# Altium PCB PCB2.pcbdoc (part 2 of 3)
Units mil, origin at the board's own origin, x right, y up, seen from the top; angles counter-clockwise.
Board outline 1771.65 x 2755.61 mil, 4 copper layers (Top Layer, Inner1, Inner2, Bottom Layer), stack 62.447 mil thick; 80 components, 88 nets, 409 pads, 183 vias.
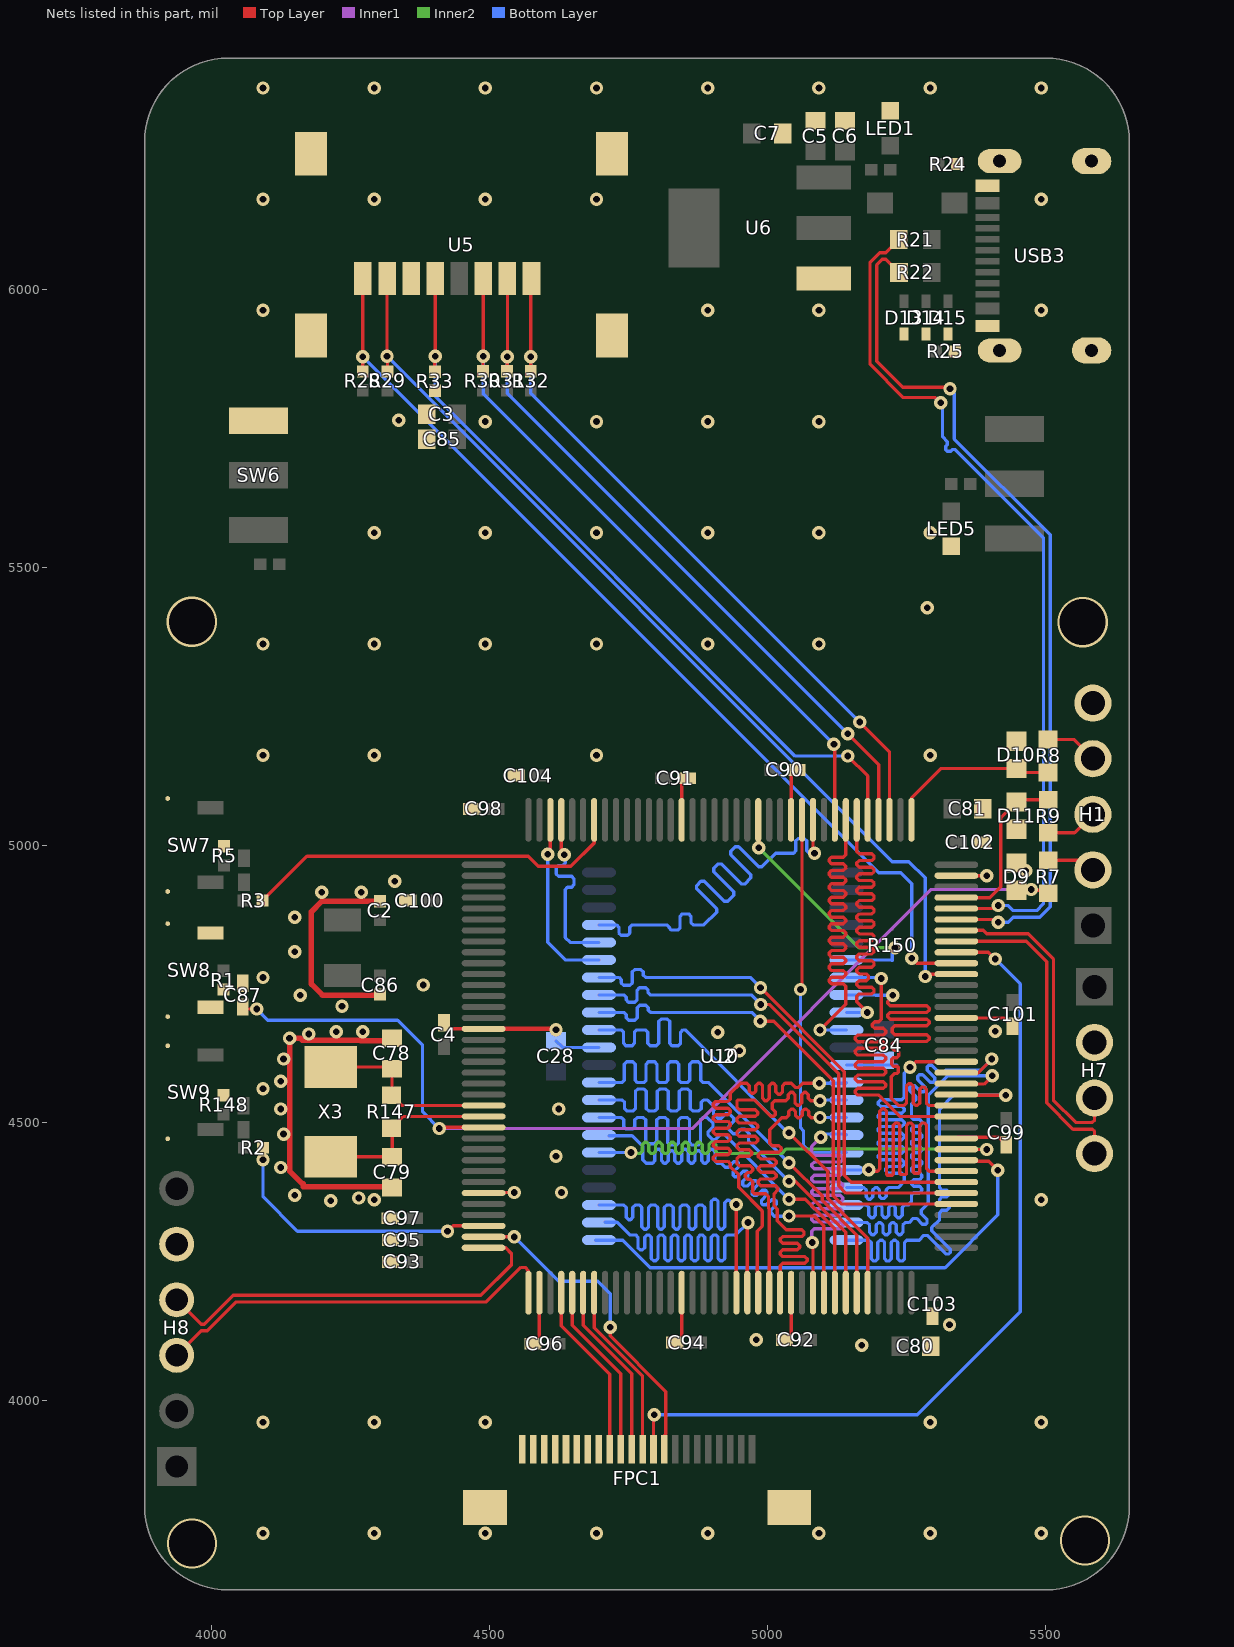
[diagram p4: the nets of this part, all layers, seen from the top]

## Via types
v1: diameter 24.02, hole 12.01, Top Layer to Bottom Layer, 179 vias
v2: diameter 90.55, hole 82.68, Top Layer to Bottom Layer, 4 vias

## Nets (pads, with @x,y where several pads share a name; then routed paths per layer and width w, separated by ;. In a path a pad name is that pad's centre, name@x,y a point inside that pad or via, vN(x,y) a via of type N, cw(c..) or ccw(c..) an arc to the next point about the centre after c; other vN are vias at no path point) (continued)
A10: U2.25 U10.56 | length 947.2
  Top Layer w6: U10.56@4944.53,4194.8 v1(4944.53,4353.18)
  Bottom Layer w6: U2.25@4697.34,4352.28 4742.07,4352.28 4746.31,4348.04 4746.31,4330.07 4750.55,4325.82 4754.07,4325.82 4758.31,4330.07 4758.31,4348.04 4762.55,4352.28 4770.31,4352.28 4774.55,4348.04 4774.55,4312.85 4778.8,4308.6 4782.31,4308.6 4786.55,4312.85 4786.55,4348.04 4790.8,4352.28 4798.55,4352.28 4802.8,4348.04 4802.8,4312.85 4807.04,4308.6 4810.55,4308.6 4814.8,4312.85 4814.8,4348.04 4819.04,4352.28 4826.8,4352.28 4831.04,4348.04 4831.04,4312.85 4835.28,4308.6 4838.8,4308.6 4843.04,4312.85 4843.04,4348.04 4847.28,4352.28 4855.04,4352.28 4859.28,4348.04 4859.28,4312.85 4863.53,4308.6 4867.04,4308.6 4871.28,4312.85 4871.28,4348.04 4875.53,4352.28 4883.28,4352.28 4887.53,4348.04 4887.53,4312.85 4891.77,4308.6 4895.28,4308.6 4899.53,4312.85 4899.53,4358.81 4903.77,4363.05 4907.28,4363.05 4911.53,4358.81 4911.53,4312.85 4915.77,4308.6 4919.28,4308.6 4923.53,4312.85 4923.53,4356.64 4927.77,4360.88 4931.28,4360.88 4935.53,4356.64 4935.53,4356.52 4939.77,4352.28 4943.63,4352.28 v1(4944.53,4353.18)
A11: U2.24 U10.57 | length 947.5
  Top Layer w6: U10.57@4964.21,4194.8 4964.21,4319.48 v1(4965.52,4320.79)
  Bottom Layer w6: U2.24@4708.95,4321.6 4729.9,4321.6 4752.91,4298.59 4763.29,4298.59 4767.53,4294.34 4767.53,4275.77 4771.78,4271.53 4775.29,4271.53 4779.53,4275.77 4779.53,4294.34 4783.78,4298.59 4787.29,4298.59 4791.53,4294.34 4791.53,4256.08 4795.78,4251.84 4799.29,4251.84 4803.53,4256.08 4803.53,4294.34 4807.78,4298.59 4811.29,4298.59 4815.53,4294.34 4815.53,4256.08 4819.78,4251.84 4823.29,4251.84 4827.53,4256.08 4827.53,4294.34 4831.78,4298.59 4835.29,4298.59 4839.53,4294.34 4839.53,4256.08 4843.78,4251.84 4847.29,4251.84 4851.53,4256.08 4851.53,4294.34 4855.78,4298.59 4859.29,4298.59 4863.53,4294.34 4863.53,4256.08 4867.78,4251.84 4871.29,4251.84 4875.53,4256.08 4875.53,4294.34 4879.78,4298.59 4883.29,4298.59 4887.53,4294.34 4887.53,4256.08 4891.78,4251.84 4895.29,4251.84 4899.53,4256.08 4899.53,4294.34 4903.78,4298.59 4907.29,4298.59 4911.53,4294.34 4911.53,4256.08 4915.78,4251.84 4919.29,4251.84 4923.53,4256.08 4923.53,4294.34 4927.78,4298.59 4943.59,4298.59 4965.52,4320.52 v1(4965.52,4320.79)
A12: U2.22 U10.87 | length 946.8
  Top Layer w6: U10.87@5340.2,4551.1 5341.3,4550 v1(5429.01,4550)
  Bottom Layer w6: U2.22@5142.66,4289.29 5182.78,4289.29 5187.02,4285.05 5187.02,4255.8 5191.26,4251.55 5194.78,4251.55 5199.02,4255.8 5199.02,4285.05 5203.26,4289.29 5206.78,4289.29 5211.02,4285.05 5211.02,4255.8 5215.26,4251.55 5218.78,4251.55 5223.02,4255.8 5223.02,4285.05 5227.26,4289.29 5230.78,4289.29 5235.02,4285.05 5235.02,4255.8 5239.26,4251.55 5242.78,4251.55 5247.02,4255.8 5247.02,4285.05 5251.26,4289.29 5273.31,4289.29 5281.61,4297.59 5287.61,4297.59 5320.83,4264.37 5326.83,4264.37 5329.31,4266.86 5329.31,4272.86 5296.1,4306.07 5296.1,4312.07 5310,4325.98 5310,4338.73 5314.24,4342.97 5322.98,4342.97 5327.23,4347.21 5327.23,4350.73 5322.98,4354.97 5314.24,4354.97 5310,4359.21 5310,4362.73 5314.24,4366.97 5322.98,4366.97 5327.23,4371.21 5327.23,4374.73 5322.98,4378.97 5314.24,4378.97 5310,4383.21 5310,4525 5335,4550 v1(5429.01,4550)
A13: U2.21 U10.88 | length 696.3
  Top Layer w6: U10.88@5340.2,4570.79 5340.99,4570 5390,4570 v1(5405,4585)
  Bottom Layer w6: U2.21@5142.66,4320.79 5179.91,4320.79 5184.15,4316.55 5184.15,4302.96 5188.4,4298.72 5191.91,4298.72 5196.15,4302.96 5196.15,4316.55 5200.4,4320.79 5203.91,4320.79 5208.15,4316.55 5208.15,4302.96 5212.4,4298.72 5215.91,4298.72 5220.15,4302.96 5220.15,4316.55 5224.4,4320.79 5227.91,4320.79 5232.15,4316.55 5232.15,4302.96 5236.4,4298.72 5239.91,4298.72 5244.15,4302.96 5244.15,4316.55 5248.4,4320.79 5255.15,4320.79 5262.61,4328.25 5268.61,4328.25 5279.12,4317.74 5285.12,4317.74 5287.6,4320.23 5287.6,4326.23 5277.09,4336.74 5277.09,4342.74 5290,4355.64 5290,4550 5325,4585 v1(5405,4585)
A14: U2.20 U10.89 | length 945.9
  Top Layer w6: U10.89@5340.2,4590.47 5379.5,4590.47 v1(5404.03,4615)
  Bottom Layer w6: U2.20@5142.66,4352.28 5178.39,4352.28 5182.64,4348.04 5182.64,4333.81 5186.88,4329.56 5190.39,4329.56 5194.64,4333.81 5194.64,4348.04 5198.88,4352.28 5202.39,4352.28 5206.64,4348.04 5206.64,4333.81 5210.88,4329.56 5214.39,4329.56 5218.64,4333.81 5218.64,4348.04 5222.88,4352.28 5226.39,4352.28 5230.64,4348.04 5230.64,4333.81 5234.88,4329.56 5238.39,4329.56 5242.64,4333.81 5242.64,4348.04 5246.88,4352.28 5253.55,4352.28 5259.55,4358.28 5259.55,4369.98 5263.79,4374.22 5273.98,4374.22 5278.23,4378.47 5278.23,4381.98 5273.98,4386.22 5263.79,4386.22 5259.55,4390.47 5259.55,4393.98 5263.79,4398.22 5273.98,4398.22 5278.23,4402.47 5278.23,4405.98 5273.98,4410.22 5263.79,4410.22 5259.55,4414.47 5259.55,4417.98 5263.79,4422.22 5273.98,4422.22 5278.23,4426.47 5278.23,4429.98 5273.98,4434.22 5263.79,4434.22 5259.55,4438.47 5259.55,4441.98 5263.79,4446.22 5273.98,4446.22 5278.23,4450.47 5278.23,4453.98 5273.98,4458.22 5263.79,4458.22 5259.55,4462.47 5259.55,4465.98 5263.79,4470.22 5273.98,4470.22 5278.23,4474.47 5278.23,4477.98 5273.98,4482.22 5263.79,4482.22 5259.55,4486.47 5259.55,4489.98 5263.79,4494.22 5273.98,4494.22 5278.23,4498.47 5278.23,4501.98 5273.98,4506.22 5263.79,4506.22 5259.55,4510.47 5259.55,4533.71 5267.46,4541.62 5267.46,4547.62 5256.72,4558.37 5256.72,4564.37 5259.2,4566.85 5265.2,4566.85 5275.94,4556.11 5281.94,4556.11 5284.43,4558.59 5284.43,4564.59 5270.91,4578.11 5270.91,4584.11 5273.4,4586.59 5279.4,4586.59 5292.91,4573.08 5298.91,4573.08 5301.4,4575.56 5301.4,4581.56 5287.88,4595.08 5287.88,4601.08 5290.37,4603.57 5296.37,4603.57 5309.89,4590.05 5315.89,4590.05 5320.85,4595.02 5384.05,4595.02 v1(5404.03,4615)
A15: U2.19 U10.90 | length 941
  Top Layer w6: v1(5256.95,4600) 5267.11,4610.16 U10.90@5340.2,4610.16
  Bottom Layer w6: U2.19@5142.66,4383.78 5173.7,4383.78 5177.94,4379.54 5177.94,4366.89 5182.18,4362.65 5185.7,4362.65 5189.94,4366.89 5189.94,4379.54 5194.18,4383.78 5197.7,4383.78 5201.94,4379.54 5201.94,4368.3 5206.18,4364.05 5209.7,4364.05 5213.94,4368.3 5213.94,4379.54 5218.18,4383.78 5235.77,4383.78 5246.7,4394.71 5246.7,4405.42 5242.46,4409.66 5217.63,4409.66 5213.39,4413.9 5213.39,4417.42 5217.63,4421.66 5242.46,4421.66 5246.7,4425.9 5246.7,4429.42 5242.46,4433.66 5204.28,4433.66 5200.04,4437.9 5200.04,4441.42 5204.28,4445.66 5242.46,4445.66 5246.7,4449.9 5246.7,4453.42 5242.46,4457.66 5204.28,4457.66 5200.04,4461.9 5200.04,4465.42 5204.28,4469.66 5242.46,4469.66 5246.7,4473.9 5246.7,4477.42 5242.46,4481.66 5204.28,4481.66 5200.04,4485.9 5200.04,4489.42 5204.28,4493.66 5242.46,4493.66 5246.7,4497.9 5246.7,4501.42 5242.46,4505.66 5204.28,4505.66 5200.04,4509.9 5200.04,4513.42 5204.28,4517.66 5242.46,4517.66 5246.7,4521.9 5246.7,4525.42 5242.46,4529.66 5204.28,4529.66 5200.04,4533.9 5200.04,4537.42 5204.28,4541.66 5242.46,4541.66 5246.7,4545.9 5246.7,4589.75 v1(5256.95,4600)
A16: U2.18 U10.80 | length 946.9
  Top Layer w6: v1(5182.53,4415.91) 5185.13,4413.31 5198.44,4413.31 5202.68,4417.55 5202.68,4521.15 5206.93,4525.4 5210.44,4525.4 5214.68,4521.15 5214.68,4407.32 5216.07,4405.93 5225.29,4405.93 5226.68,4407.32 5226.68,4495.71 5230.93,4499.96 5234.44,4499.96 5238.68,4495.71 5238.68,4408.77 5240.07,4407.39 5249.22,4407.39 5250.68,4408.84 5250.68,4495.71 5254.93,4499.96 5258.44,4499.96 5262.68,4495.71 5262.68,4411.33 5264.48,4409.54 5273.01,4409.54 5274.68,4411.21 5274.68,4495.71 5278.93,4499.96 5282.44,4499.96 5286.68,4495.71 5286.68,4417.55 5290.93,4413.31 U10.80@5340.2,4413.31
  Bottom Layer w6: U2.18@5142.66,4415.28 5181.9,4415.28 v1(5182.53,4415.91)
A17: U2.23 U10.81 | length 945
  Top Layer w6: U10.81@5340.2,4432.99 5341.89,4431.3 5398.7,4431.3 v1(5415,4415)
  Bottom Layer w6: U2.23@4691.26,4289.16 4739.99,4289.16 4789.36,4239.78 5319.87,4239.78 5414.94,4334.86 v1@5414.94,4414.04
A18: U2.28 U10.82 | length 946
  Top Layer w6: U10.82@5338.79,4452.37 5338.87,4452.3 v1(5395.08,4452.3)
  Inner2 w6: v1@4749.03,4445.05 4770.9,4445.05 4775.14,4449.29 4775.14,4460.98 4779.39,4465.22 4782.9,4465.22 4787.14,4460.98 4787.14,4449.29 4791.39,4445.05 4794.9,4445.05 4799.14,4449.29 4799.14,4460.98 4803.39,4465.22 4806.9,4465.22 4811.14,4460.98 4811.14,4449.29 4815.39,4445.05 4818.9,4445.05 4823.14,4449.29 4823.14,4460.98 4827.39,4465.22 4830.9,4465.22 4835.14,4460.98 4835.14,4449.29 4839.39,4445.05 4842.9,4445.05 4847.14,4449.29 4847.14,4460.98 4851.39,4465.22 4854.9,4465.22 4859.14,4460.98 4859.14,4449.29 4863.39,4445.05 4866.9,4445.05 4871.14,4449.29 4871.14,4460.98 4875.39,4465.22 4878.9,4465.22 4883.14,4460.98 4883.14,4449.29 4887.39,4445.05 4890.9,4445.05 4895.14,4449.29 4895.14,4460.98 4899.39,4465.22 4902.9,4465.22 4907.14,4460.98 4907.14,4449.29 4911.39,4445.05 5025.79,4445.05 5033.75,4453.01 5394.37,4453.01 v1(5395.08,4452.3)
  Bottom Layer w6: U2.28@4697.34,4446.77 v1(4755,4446.77)
BOOT0: R3.1 U10.138 | length 696.3
  Top Layer w6: R3.1@4092.04,4900 4172.04,4980 4570,4980 4588.32,4961.68 4646.68,4961.68 4688.62,5003.62 U10.138@4688.62,5045.2
CLK: H1.4 R8.1 | length 94.7
  Top Layer w6: R8.1@5505.48,5189.88 5551.24,5189.88 H1.4@5585.85,5155.26
CS: R150.2 U2.6 U10.123 | length 477.5
  Top Layer w5.98: U10.123@4983.9,5045.2 4985,5044.1 v1(4985,4995)
  Inner2 w5.98: v1(4985,4995) 5165,4815 v1(5230,4815)
  Bottom Layer w5.98: R150.2@5225,4792.44 5225,4810 v1(5230,4815)
  Bottom Layer w6: U2.6@5142.66,4793.23 5224.21,4793.23 R150.2@5225,4792.44
DAISY: FPC1.9 U10.35 | length 592
  Top Layer w6: U10.35@4489.8,4295.2 4490,4295 v1(4545,4295) ; v1(4717.39,4132.3) 4717.39,4116.78 4817.78,4016.38 4817.78,3940.42 4815.09,3937.72 FPC1.9@4815.09,3913.35
  Bottom Layer w6: v1(4545,4295) 4625,4215 4695,4215 4717.39,4192.61 v1(4717.39,4132.3)
DIO: H1.3 R9.1 | length 93.9
  Top Layer w6: R9.1@5505.63,5022.3 5552.9,5022.3 H1.3@5585.85,5055.26
GND: C2.1 C3.1 C4.1 C5.1 C6.1 C7.2 C28.2 C78.1 C79.1 C80.2 C81.2 C84.2 C85.1 C86.1 C87.1 C90.2 C91.2 C92.2 C93.2 C94.2 C95.2 C96.2 C97.2 C98.2 C99.2 C100.2 C101.2 C102.2 C103.2 C104.1 D9.2 D10.2 D11.2 D13.1 D14.1 D15.1 FPC1.15 FPC1.16 FPC1.17 FPC1.18 FPC1.19 FPC1.20 FPC1.21 FPC1.22 FPC1.23 FPC1.24 H1.5 H7.2 H8.5 LED1.1 LED5.1 R5.2 R24.2 R25.2 R33.2 R148.2 SW6.3 SW7.3 SW7.4 SW8.2 SW8.3 SW8.4 SW9.3 SW9.4 U2.12 U2.34 U5.6 U5.9 U5.10 U5.11 U5.12 U6.1 U10.16 U10.31 U10.38 U10.51 U10.61 U10.83 U10.94 U10.107 U10.120 U10.130 USB3.1 USB3.12 USB3.13 USB3.14 | length 2169.7
  Top Layer w6: C4.1@4418.54,4680.5 4429.83,4669.21 U10.16@4489.8,4669.21 ; U10.31@4489.8,4373.94 4490.86,4375 v1(4545,4375) ; C96.2@4578.7,4102.72 4590.2,4114.22 U10.38@4590.2,4194.8 ; C94.2@4833.54,4105 4846.1,4117.56 U10.51@4846.1,4194.8 ; U10.130@4846.1,5045.2 4846.1,5109.64 C91.2@4856.46,5120 ; C92.2@5031.05,4109.69 5042.95,4121.59 U10.61@5042.95,4194.8 ; U10.120@5042.95,5045.2 5042.95,5124.76 C90.2@5053.19,5135 ; U10.83@5340.2,4472.36 5342.2,4474.36 5416.56,4474.36 C99.2@5429.86,4461.05 ; U10.94@5340.2,4688.9 5426.3,4688.9 C101.2@5441.34,4673.86 ; U10.107@5340.2,4944.8 v1(5395.2,4944.8)
  Top Layer w7.87: U10.16@4489.8,4669.21 4618.7,4669.21 v1(4620,4667.91)
  Top Layer w10: C2.1@4303.59,4899.16 4199.16,4899.16 4180,4880 4180,4750 4200,4730 4302.58,4730 C86.1@4303.65,4731.06 ; C78.1@4325,4652.56 4320,4647.56 4268.33,4647.56 4266.79,4649.1 4163.21,4649.1 4159.74,4652.56 v1(4140.79,4652.56) 4140.79,4413.32 4163.21,4390.9 4164.36,4390.9 4165,4390.27 4165,4385 4324.1,4385 C79.1@4325.2,4383.89
  Bottom Layer w6: C28.2@4620,4647.56 4631.81,4635.75 U2.34@4697.34,4635.75 ; U2.12@5142.66,4604.25 5233.19,4604.25
  other v1: 4093.03,3761.73 4293.03,3761.73 4493.03,3761.73 4693.03,3761.73 4893.03,3761.73 5093.03,3761.73 5293.03,3761.73 5493.03,3761.73 4093.03,3961.73 4293.03,3961.73 4493.03,3961.73 5293.03,3961.73 5493.03,3961.73 5170,4100 4980,4110 5328.03,4136.73 4215,4360 4293.03,4361.73 5493.03,4361.73 4265,4365 4150,4370 4630,4375 4125,4420 4620,4440 4130,4480 4125,4525 4625,4525 4093.03,4561.73 4125,4575 4130,4615 4950,4630 4175,4660 4911.06,4663.17 4225,4664.01 4272.56,4664.01 5410,4665 4235,4710 4160,4730 4381.02,4748.1 4093.03,4761.73 4150,4808.18 4150,4870 4198.73,4915 4270,4915 4330,4935 5465,4953.79 4093.03,5161.73 4293.03,5161.73 4693.03,5161.73 5293.03,5161.73 4093.03,5361.73 4293.03,5361.73 4493.03,5361.73 4693.03,5361.73 4893.03,5361.73 5093.03,5361.73 5288.03,5426.73 4293.03,5561.73 4493.03,5561.73 4693.03,5561.73 4893.03,5561.73 5093.03,5561.73 5293.03,5561.73 4493.03,5761.73 4693.03,5761.73 4893.03,5761.73 5093.03,5761.73 4336.89,5764.22 4093.03,5961.73 4893.03,5961.73 5093.03,5961.73 5493.03,5961.73 4093.03,6161.73 4293.03,6161.73 4493.03,6161.73 4693.03,6161.73 5493.03,6161.73 4093.03,6361.73 4293.03,6361.73 4493.03,6361.73 4693.03,6361.73 4893.03,6361.73 5093.03,6361.73 5293.03,6361.73 5493.03,6361.73
  other v2: 3965.18,3743.42 5571.73,3748.98 5567.35,5401.03 3964.91,5401.64
IO0: U2.7 U10.85 | length 947.3
  Top Layer w6: v1(5205,4760) 5205,4686.39 5200.76,4682.15 5193.1,4682.15 5188.86,4677.91 5188.86,4674.39 5193.1,4670.15 5208.98,4670.15 5213.23,4665.91 5213.23,4662.39 5208.98,4658.15 5162.71,4658.15 5158.47,4653.91 5158.47,4650.39 5162.71,4646.15 5208.98,4646.15 5213.23,4641.91 5213.23,4638.39 5208.98,4634.15 5162.71,4634.15 5158.47,4629.91 5158.47,4626.39 5162.71,4622.15 5208.98,4622.15 5213.23,4617.91 5213.23,4614.39 5208.98,4610.15 5162.71,4610.15 5158.47,4605.91 5158.47,4602.39 5162.71,4598.15 5208.98,4598.15 5213.23,4593.91 5213.23,4590.39 5208.98,4586.15 5162.71,4586.15 5158.47,4581.91 5158.47,4578.39 5162.71,4574.15 5208.98,4574.15 5213.23,4569.91 5213.23,4566.39 5208.98,4562.15 5162.71,4562.15 5158.47,4557.91 5158.47,4554.39 5162.71,4550.15 5200.76,4550.15 5205,4545.91 5205,4545 5238.27,4511.73 U10.85@5340.2,4511.73
  Bottom Layer w6: U2.7@5142.66,4761.73 5203.27,4761.73 v1(5205,4760)
IO1: U2.8 U10.86 | length 946.8
  Top Layer w6: v1(5225.99,4730) 5225,4729.01 5225,4726.81 5216.77,4718.58 5216.77,4715.06 5221.02,4710.82 5286.98,4710.82 5291.23,4706.58 5291.23,4703.06 5286.98,4698.82 5221.02,4698.82 5216.77,4694.58 5216.77,4691.06 5221.02,4686.82 5286.98,4686.82 5291.23,4682.58 5291.23,4679.06 5286.98,4674.82 5229.24,4674.82 5225,4670.58 5225,4662.82 5229.24,4658.58 5286.98,4658.58 5291.23,4654.34 5291.23,4650.82 5286.98,4646.58 5229.24,4646.58 5225,4642.34 5225,4634.58 5229.24,4630.34 5233.49,4630.34 5236.57,4627.25 5236.57,4620.55 5233.33,4617.31 5226.44,4617.31 5223.77,4614.64 5223.77,4605.38 5227.06,4602.09 5233.93,4602.09 5235.96,4600.06 5235.96,4591.26 5233.7,4589 5229.24,4589 5223.24,4583 5223.24,4544.23 5236.05,4531.42 5246.2,4531.42 5250.44,4535.66 5250.44,4566.58 5254.69,4570.82 5258.2,4570.82 5262.44,4566.58 5262.44,4535.66 5266.69,4531.42 5270.2,4531.42 5274.44,4535.66 5274.44,4560.58 5278.69,4564.82 5282.2,4564.82 5286.44,4560.58 5286.44,4535.66 5290.69,4531.42 U10.86@5340.2,4531.42
  Bottom Layer w6: U2.8@5142.66,4730.24 5194.76,4730.24 5195,4730 v1(5225.99,4730)
IO2: U2.9 U10.114 | length 947
  Top Layer w6: U10.114@5161.06,5045.2 5161.06,4988.28 5165.3,4984.04 5187.93,4984.04 5192.18,4979.8 5192.18,4976.28 5187.93,4972.04 5165.3,4972.04 5161.06,4967.8 5161.06,4964.28 5165.3,4960.04 5187.93,4960.04 5192.18,4955.8 5192.18,4952.28 5187.93,4948.04 5165.3,4948.04 5161.06,4943.8 5161.06,4940.28 5165.3,4936.04 5187.93,4936.04 5192.18,4931.8 5192.18,4928.28 5187.93,4924.04 5165.3,4924.04 5161.06,4919.8 5161.06,4916.28 5165.3,4912.04 5187.93,4912.04 5192.18,4907.8 5192.18,4904.28 5187.93,4900.04 5165.3,4900.04 5161.06,4895.8 5161.06,4892.28 5165.3,4888.04 5187.93,4888.04 5192.18,4883.8 5192.18,4880.28 5187.93,4876.04 5165.3,4876.04 5161.06,4871.8 5161.06,4868.28 5165.3,4864.04 5187.93,4864.04 5192.18,4859.8 5192.18,4856.28 5187.93,4852.04 5165.3,4852.04 5161.06,4847.8 5161.06,4844.28 5165.3,4840.04 5187.93,4840.04 5192.18,4835.8 5192.18,4832.28 5187.93,4828.04 5165.3,4828.04 5161.06,4823.8 5161.06,4820.28 5165.3,4816.04 5187.93,4816.04 5192.18,4811.8 5192.18,4808.28 5187.93,4804.04 5165.3,4804.04 5161.06,4799.8 5161.06,4796.28 5165.3,4792.04 5187.93,4792.04 5192.18,4787.8 5192.18,4784.28 5187.93,4780.04 5165.3,4780.04 5161.06,4775.8 5161.06,4772.28 5165.3,4768.04 5178.01,4768.04 5182.25,4763.8 5182.25,4760.28 5178.01,4756.04 5165.3,4756.04 5161.06,4751.8 5161.06,4748.28 5165.3,4744.04 5187.93,4744.04 5192.18,4739.8 5192.18,4736.28 5187.93,4732.04 5165.3,4732.04 5161.06,4727.8 5161.06,4717.68 v1(5180,4698.74)
  Bottom Layer w6: U2.9@5142.66,4698.74 v1(5180,4698.74)
IO3: U2.10 U10.115 | length 946.3
  Top Layer w6: v1(5095,4667.24) 5141.38,4713.62 5141.38,4745.99 5137.14,4750.23 5115.58,4750.23 5111.33,4754.47 5111.33,4757.99 5115.58,4762.23 5137.14,4762.23 5141.38,4766.47 5141.38,4769.99 5137.14,4774.23 5115.58,4774.23 5111.33,4778.47 5111.33,4781.99 5115.58,4786.23 5137.14,4786.23 5141.38,4790.47 5141.38,4793.99 5137.14,4798.23 5115.58,4798.23 5111.33,4802.47 5111.33,4805.99 5115.58,4810.23 5137.14,4810.23 5141.38,4814.47 5141.38,4817.99 5137.14,4822.23 5115.58,4822.23 5111.33,4826.47 5111.33,4829.99 5115.58,4834.23 5137.14,4834.23 5141.38,4838.47 5141.38,4841.99 5137.14,4846.23 5115.58,4846.23 5111.33,4850.47 5111.33,4853.99 5115.58,4858.23 5137.14,4858.23 5141.38,4862.47 5141.38,4865.99 5137.14,4870.23 5115.58,4870.23 5111.33,4874.47 5111.33,4877.99 5115.58,4882.23 5137.14,4882.23 5141.38,4886.47 5141.38,4889.99 5137.14,4894.23 5115.58,4894.23 5111.33,4898.47 5111.33,4901.99 5115.58,4906.23 5137.14,4906.23 5141.38,4910.47 5141.38,4913.99 5137.14,4918.23 5115.58,4918.23 5111.33,4922.47 5111.33,4925.99 5115.58,4930.23 5137.14,4930.23 5141.38,4934.47 5141.38,4937.99 5137.14,4942.23 5115.58,4942.23 5111.33,4946.47 5111.33,4949.99 5115.58,4954.23 5137.14,4954.23 5141.38,4958.47 5141.38,4961.99 5137.14,4966.23 5115.58,4966.23 5111.33,4970.47 5111.33,4973.99 5115.58,4978.23 5137.14,4978.23 5141.38,4982.47 U10.115@5141.38,5045.2
  Bottom Layer w6: v1(5095,4667.24) U2.10@5142.66,4667.24
IO4: U2.13 U10.58 | length 946.6
  Top Layer w6: U10.58@4982.32,4223.11 4982.32,4305.57 4991.25,4314.5 4991.26,4341.62 4948.51,4384.37 4948.51,4406.49 4933.79,4421.21 4933.79,4426.45 4929.55,4430.69 4907.44,4430.69 4903.2,4434.93 4903.2,4438.45 4907.44,4442.69 4929.55,4442.69 4933.79,4446.93 4933.79,4450.45 4929.55,4454.69 4907.44,4454.69 4903.2,4458.93 4903.2,4462.45 4907.44,4466.69 4929.55,4466.69 4933.79,4470.93 4933.79,4474.45 4929.55,4478.69 4907.44,4478.69 4903.2,4482.93 4903.2,4486.45 4907.44,4490.69 4929.55,4490.69 4933.79,4494.93 4933.79,4498.45 4929.55,4502.69 4907.44,4502.69 4903.2,4506.93 4903.2,4510.45 4907.44,4514.69 4929.55,4514.69 4933.79,4518.93 4933.79,4522.45 4929.55,4526.69 4907.44,4526.69 4903.2,4530.93 4903.2,4534.45 4907.44,4538.69 4929.55,4538.69 4933.79,4542.93 4933.79,4553.26 4952.06,4571.54 4963.39,4571.54 4967.63,4567.29 4967.63,4557.42 4971.88,4553.18 4975.39,4553.18 4979.63,4557.42 4979.63,4567.29 4983.88,4571.54 4987.39,4571.54 4991.63,4567.29 4991.63,4544.32 4995.88,4540.08 4999.39,4540.08 5003.63,4544.32 5003.63,4567.29 5007.88,4571.54 5011.39,4571.54 5015.63,4567.29 5015.63,4556.02 5019.88,4551.77 5023.39,4551.77 5027.63,4556.02 5027.63,4567.29 5031.88,4571.54 5043.64,4571.54 5051.52,4563.66 5055.64,4563.66 5063.52,4571.54 v1(5093.78,4571.54)
  Bottom Layer w6: v1(5093.78,4571.54) 5141.44,4571.54 U2.13@5142.66,4572.76
IO5: U2.14 U10.59 | length 946.4
  Top Layer w6: U10.59@5003.58,4194.8 5003.58,4345.72 5002.25,4347.04 5002.25,4367.75 4997.18,4372.82 4976.47,4372.82 4973.93,4375.37 4973.93,4394.57 4969.68,4398.81 4964.53,4398.81 4960.29,4403.05 4960.29,4406.57 4964.53,4410.81 4969.68,4410.81 4973.93,4415.05 4973.93,4418.57 4969.68,4422.81 4949.35,4422.81 4945.11,4427.05 4945.26,4427.05 4945.56,4427.35 4945.56,4435.57 4949.8,4439.82 4967.93,4439.82 4972.17,4444.06 4972.17,4447.57 4967.93,4451.82 4949.8,4451.82 4945.56,4456.06 4945.56,4459.57 4949.8,4463.82 4978.74,4463.82 4982.98,4468.06 4982.98,4471.57 4978.74,4475.82 4949.8,4475.82 4945.56,4480.06 4945.56,4483.57 4949.8,4487.82 4978.74,4487.82 4982.98,4492.06 4982.98,4495.57 4978.74,4499.82 4949.8,4499.82 4945.56,4504.06 4945.56,4507.57 4949.8,4511.82 4978.74,4511.82 4982.98,4516.06 4982.98,4519.57 4978.74,4523.82 4949.8,4523.82 4945.56,4528.06 4945.56,4539.4 4947.56,4541.41 4976.6,4541.41 5006.04,4511.97 5012.04,4511.97 5014.52,4514.45 5014.52,4520.45 5009.31,4525.66 5009.31,4535.84 5013.48,4540 5033.72,4540 5037.96,4544.24 5037.96,4550.76 5042.2,4555 5045.72,4555 5049.96,4550.76 5049.96,4536.37 5054.2,4532.13 5057.72,4532.13 5061.96,4536.37 5061.96,4550.76 5066.2,4555 5069.72,4555 5073.96,4550.76 5073.96,4544.24 5078.2,4540 v1(5095,4540)
  Bottom Layer w6: v1(5095,4540) 5096.26,4541.26 U2.14@5142.66,4541.26
IO6: U2.15 U10.60 | length 899.9
  Top Layer w6: U10.60@5023.27,4194.8 5023.31,4243.48 5027.55,4247.72 5067.76,4247.72 5072,4251.96 5072,4255.48 5067.76,4259.72 5027.55,4259.72 5023.31,4263.96 5023.31,4267.48 5027.55,4271.72 5054.03,4271.72 5058.27,4275.96 5058.27,4279.48 5054.03,4283.72 5027.55,4283.72 5023.31,4287.96 5023.31,4291.48 5027.55,4295.72 5062.05,4295.72 5066.29,4299.96 5066.29,4303.48 5062.05,4307.72 5034.53,4307.72 5018.27,4323.98 5018.27,4345.19 5012.27,4351.19 5012.27,4372.4 5019.32,4379.45 5019.32,4382.97 5015.08,4387.21 4988.18,4387.21 4983.94,4391.45 4983.94,4394.97 4988.18,4399.21 5012.08,4399.21 5016.32,4403.45 5016.32,4406.97 5012.08,4411.21 4988.18,4411.21 4983.94,4415.45 4983.94,4418.97 4988.18,4423.21 5012.08,4423.21 5016.32,4427.45 5016.32,4430.97 5012.08,4435.21 4988.18,4435.21 4983.94,4439.45 4983.94,4442.97 4988.18,4447.21 5020.8,4447.21 5025.04,4451.45 5025.04,4454.97 5020.8,4459.21 5008.74,4459.21 5004.49,4463.45 5004.49,4487.77 5025.9,4509.18 5034.58,4509.18 5038.82,4513.43 5038.82,4520.76 5043.07,4525 5046.58,4525 5050.82,4520.76 5050.82,4513.43 5055.07,4509.18 5058.58,4509.18 5062.82,4513.43 5062.82,4520.76 5067.07,4525 5070.58,4525 5074.82,4520.76 5074.82,4513.43 5079.07,4509.18 v1@5092.95,4509.18
  Bottom Layer w6: v1(5095,4509.76) U2.15@5142.66,4509.76
IO7: U2.16 U10.63 | length 946.1
  Top Layer w6: v1(5081.02,4285) 5082.32,4283.7 U10.63@5082.32,4194.8
  Inner1 w6: v1(5081.02,4285) 5080,4286.02 5080,4305.52 5084.24,4309.76 5131.53,4309.76 5135.77,4314 5135.77,4317.52 5131.53,4321.76 5084.24,4321.76 5080,4326 5080,4329.52 5084.24,4333.76 5131.53,4333.76 5135.77,4338 5135.77,4341.52 5131.53,4345.76 5084.24,4345.76 5080,4350 5080,4353.52 5084.24,4357.76 5131.53,4357.76 5135.77,4362 5135.77,4365.52 5131.53,4369.76 5084.24,4369.76 5080,4374 5080,4377.52 5084.24,4381.76 5131.53,4381.76 5135.77,4386 5135.77,4389.52 5131.53,4393.76 5084.24,4393.76 5080,4398 5080,4401.52 5084.24,4405.76 5131.53,4405.76 5135.77,4410 5135.77,4413.52 5131.53,4417.76 5084.24,4417.76 5080,4422 5080,4425.52 5084.24,4429.76 5131.53,4429.76 5135.77,4434 5135.77,4437.52 5131.53,4441.76 5084.24,4441.76 5080,4446 5080,4457.76 v1(5096.24,4474)
  Bottom Layer w6: v1(5096.24,4474) 5102.24,4480 5140.93,4480 U2.16@5142.66,4478.27
IO8: U2.29 U10.64 | length 946.3
  Top Layer w6: v1(5039.26,4332.67) 5084.18,4332.67 5102.01,4314.84 U10.64@5102.01,4194.8
  Bottom Layer w6: U2.29@4715.67,4477.22 4756.8,4477.22 ; 4756.9,4477.2 4775.99,4458.11 4775.99,4434.01 4782.2,4427.8 4793.72,4427.8 4797.97,4432.04 4797.97,4448.55 4802.21,4452.79 4805.72,4452.79 4809.97,4448.55 4809.97,4432.04 4814.21,4427.8 4817.72,4427.8 4821.97,4432.04 4821.97,4445.55 4826.21,4449.79 4829.72,4449.79 4833.97,4445.55 4833.97,4432.04 4838.21,4427.8 4841.72,4427.8 4845.97,4432.04 4845.97,4448.55 4850.21,4452.79 4853.72,4452.79 4857.97,4448.55 4857.97,4432.04 4862.21,4427.8 4865.72,4427.8 4869.97,4432.04 4869.97,4445.55 4874.21,4449.79 4877.72,4449.79 4881.97,4445.55 4881.97,4432.04 4886.21,4427.8 4889.72,4427.8 4893.97,4432.04 4893.97,4448.55 4898.21,4452.79 4901.72,4452.79 4905.97,4448.55 4905.97,4432.04 4910.21,4427.8 4917.16,4427.8 4924.48,4420.48 4930.48,4420.48 4940.02,4430.01 4946.02,4430.01 4948.5,4427.53 4948.5,4421.53 4938.97,4411.99 4938.97,4405.99 4941.45,4403.51 4947.45,4403.51 4956.99,4413.04 4962.99,4413.04 4965.48,4410.56 4965.48,4404.56 4955.94,4395.02 4955.94,4389.02 4958.42,4386.53 4964.42,4386.53 4973.96,4396.07 4979.96,4396.07 4982.45,4393.59 4982.45,4387.59 4972.91,4378.05 4972.91,4372.05 4975.39,4369.56 4981.39,4369.56 4990.93,4379.1 4996.93,4379.1 4999.42,4376.62 4999.42,4370.62 4989.88,4361.08 4989.88,4355.08 4992.36,4352.59 4998.36,4352.59 5007.9,4362.13 5013.9,4362.13 5016.39,4359.65 5016.39,4353.65 5006.85,4344.11 5006.85,4338.11 5012.89,4332.07 v1@5039.43,4332.07
IO9: U2.30 U10.65 | length 948.8
  Top Layer w6: v1(5039.07,4362.68) 5068.34,4362.68 5121.69,4309.33 U10.65@5121.69,4194.8
  Bottom Layer w6: U2.30@4697.34,4509.76 4737.88,4509.76 4742.12,4505.52 4742.12,4493.24 4746.37,4488.99 4757.57,4488.99 4761.81,4493.24 4761.81,4505.52 4766.05,4509.76 4777.25,4509.76 4781.49,4505.52 4781.49,4466.69 4785.74,4462.45 4796.94,4462.45 4801.18,4466.69 4801.18,4505.52 4805.42,4509.76 4816.62,4509.76 4820.86,4505.52 4820.86,4464.51 4825.11,4460.27 4836.31,4460.27 4840.55,4464.51 4840.55,4505.52 4844.79,4509.76 4855.99,4509.76 4860.23,4505.52 4860.23,4464.51 4864.48,4460.27 4875.68,4460.27 4879.92,4464.51 4879.92,4505.52 4884.16,4509.76 4891.98,4509.76 4902.52,4499.22 4902.52,4493.22 4893.51,4484.2 4893.51,4478.2 4901.43,4470.28 4907.43,4470.28 4916.44,4479.3 4922.44,4479.3 v1(5039.07,4362.68)
IO10: U2.31 U10.66 | length 944.5
  Top Layer w6: v1(5039.07,4394.92) 5050.26,4394.92 5141.38,4303.8 U10.66@5141.38,4194.8
  Bottom Layer w6: U2.31@4697.34,4541.26 4739.09,4541.26 4743.33,4537.02 4743.33,4525.78 4747.58,4521.53 4758.78,4521.53 4763.02,4525.78 4763.02,4556.74 4767.26,4560.99 4778.46,4560.99 4782.7,4556.74 4782.7,4525.78 4786.95,4521.53 4798.15,4521.53 4802.39,4525.78 4802.39,4556.74 4806.63,4560.99 4817.83,4560.99 4822.07,4556.74 4822.07,4525.78 4826.32,4521.53 4837.52,4521.53 4841.76,4525.78 4841.76,4556.74 4846,4560.99 4857.2,4560.99 4861.44,4556.74 4861.44,4525.78 4865.69,4521.53 4876.89,4521.53 4881.13,4525.78 4881.13,4537.02 4885.37,4541.26 4892.73,4541.26 4904.55,4529.44 4904.55,4523.44 4903.34,4522.24 4903.34,4516.24 4911.26,4508.32 4917.26,4508.32 4925.67,4516.73 4931.67,4516.73 4939.59,4508.81 4939.59,4502.81 4931.18,4494.4 4931.18,4488.4 4939.1,4480.48 4945.1,4480.48 4953.51,4488.89 4959.51,4488.89 4967.43,4480.97 4967.43,4474.97 4966.23,4473.76 4966.23,4467.76 v1(5039.07,4394.92)
IO11: U2.32 U10.67 | length 945.2
  Top Layer w6: v1(5039.07,4428.64) 5098.75,4368.96 5098.75,4360.59 5161.06,4298.29 U10.67@5161.06,4194.8
  Bottom Layer w6: U2.32@4697.34,4572.76 4738.4,4572.76 4742.64,4577 4742.64,4605.92 4746.88,4610.16 4758.08,4610.16 4762.33,4605.92 4762.33,4577 4766.57,4572.76 4777.77,4572.76 4782.01,4577 4782.01,4605.92 4786.25,4610.16 4797.45,4610.16 4801.7,4605.92 4801.7,4577 4805.94,4572.76 4817.14,4572.76 4821.38,4577 4821.38,4605.92 4825.62,4610.16 4836.82,4610.16 4841.07,4605.92 4841.07,4577 4845.31,4572.76 4856.51,4572.76 4860.75,4577 4860.75,4605.92 4864.99,4610.16 4876.19,4610.16 4880.44,4605.92 4880.44,4577 4884.68,4572.76 4894.95,4572.76 v1(5039.07,4428.64)
IO12: U2.35 U10.68 | length 944.7
  Top Layer w6: v1(5039.07,4482.68) 5108.77,4412.97 5108.77,4364.74 5180.75,4292.76 U10.68@5180.75,4194.8
  Bottom Layer w6: U2.35@4697.34,4667.24 4737.25,4667.24 4741.49,4663 4741.49,4643.09 4745.73,4638.85 4756.93,4638.85 4761.17,4643.09 4761.17,4663 4765.42,4667.24 4780.86,4667.24 4785.1,4663 4785.1,4643.09 4789.35,4638.85 4800.54,4638.85 4804.79,4643.09 4804.79,4682.72 4809.03,4686.97 4820.23,4686.97 4824.47,4682.72 4824.47,4643.09 4828.72,4638.85 4839.91,4638.85 4844.16,4643.09 4844.16,4663 4848.4,4667.24 4852.76,4667.24 5037.32,4482.68 v1(5039.07,4482.68)
IO13: U2.36 U10.77 | length 945.2
  Top Layer w6: v1(4987.56,4683.22) 5011.78,4683.22 5118.79,4576.21 5118.79,4368.89 5133.43,4354.25 U10.77@5340.2,4354.25
  Bottom Layer w6: U2.36@4697.34,4698.74 4742.2,4698.74 4746.44,4694.5 4746.44,4689.28 4750.69,4685.04 4761.89,4685.04 4766.13,4689.28 4766.13,4707.37 4770.37,4711.62 4781.57,4711.62 4785.81,4707.37 4785.81,4702.98 4790.06,4698.74 4972.05,4698.74 v1(4987.56,4683.22)
IO14: U2.37 U10.78 | length 946.2
  Top Layer w6: v1(4988.22,4713.22) 5003.75,4713.22 5128.8,4588.17 5128.8,4386.87 5141.73,4373.94 U10.78@5340.2,4373.94
  Bottom Layer w6: U2.37@4697.34,4730.24 4741.97,4730.24 4746.21,4726 4746.21,4721.31 4750.46,4717.06 4761.66,4717.06 4765.9,4721.31 4765.9,4739.17 4770.14,4743.42 4781.34,4743.42 4785.58,4739.17 4785.58,4734.48 4789.83,4730.24 4971.21,4730.24 v1(4988.22,4713.22)
IO15: U2.38 U10.79 | length 946.7
  Top Layer w6: v1(4987.98,4743.22) 5138.82,4592.39 5138.82,4405.93 5151.13,4393.62 U10.79@5340.2,4393.62
  Bottom Layer w6: U2.38@4697.34,4761.73 4733.41,4761.73 4737.65,4757.49 4737.65,4751.72 4741.89,4747.48 4753.09,4747.48 4757.33,4751.72 4757.33,4771.74 4761.58,4775.98 4772.78,4775.98 4777.02,4771.74 4777.02,4765.97 4781.26,4761.73 4969.48,4761.73 v1(4987.98,4743.22)
LB: U2.39 U10.142 | length 327.6
  Top Layer w6: v1(4605.14,4983.31) 4609.88,4988.05 U10.142@4609.88,5045.2
  Bottom Layer w6: v1(4605.14,4983.31) 4605.14,4824.86 4636.77,4793.23 U2.39@4697.34,4793.23
NRST: C87.2 D9.1 R1.2 R7.2 SW8.1 U10.25 | length 1897.2
  Top Layer w6: C87.2@4056.63,4708.49 4060.12,4705 v1(4081.63,4705) ; v1(4410,4490) 4412.05,4492.05 U10.25@4489.8,4492.05 ; D9.1@5448.5,4918.61 5500.37,4918.61 R7.2@5505.62,4913.35
  Inner1 w6: v1(4410,4490) 4865,4490 5295,4920 v1(5475,4920)
  Bottom Layer w6: v1(4081.63,4705) 4101.63,4685 4335,4685 4380,4640 4380,4520 v1(4410,4490)
OE: U2.41 U10.118 | length 943.8
  Top Layer w6: U10.118@5082.32,5045.2 5082.32,4987.68 v1(5085,4985)
  Bottom Layer w6: U2.41@4697.34,4856.22 4729.02,4856.22 4733.27,4851.98 4733.27,4841.68 4737.51,4837.44 4748.71,4837.44 4752.95,4841.68 4752.95,4851.98 4757.19,4856.22 4819.27,4856.22 4823.51,4851.98 4823.51,4851.24 4827.75,4847 4838.95,4847 4843.2,4851.24 4843.2,4871.7 4847.44,4875.95 4858.64,4875.95 4862.88,4871.7 4862.88,4860.46 4867.12,4856.22 4886.22,4856.22 4909.01,4879.01 4909.01,4885.01 4872.89,4921.13 4872.89,4927.13 4880.81,4935.05 4886.81,4935.05 4922.93,4898.93 4928.93,4898.93 4939.85,4909.85 4939.85,4915.85 4903.73,4951.97 4903.73,4957.97 4911.65,4965.89 4917.65,4965.89 4953.77,4929.77 4959.77,4929.77 4970.69,4940.69 4970.69,4946.69 4934.57,4982.81 4934.57,4988.81 4942.49,4996.73 4948.49,4996.73 4984.61,4960.61 4990.61,4960.61 5015,4985 5047.32,4985 5051.56,4989.24 5051.56,5007.39 5055.8,5011.64 5067,5011.64 5071.24,5007.39 5071.24,4989.24 5075.49,4985 v1(5085,4985)
OSC25_IN: C78.2 R147.2 U10.23 X3.2 | length 332.9
  Top Layer w5.98: X3.2@4215,4600.71 4321.73,4600.71 C78.2@4325,4597.44 4325,4551.06 R147.2@4323.87,4549.93 4342.38,4531.42 U10.23@4489.8,4531.42
OSC25_OUT: C79.2 R147.1 U10.24 X3.1 | length 337.1
  Top Layer w5.98: X3.1@4215,4439.29 4324.93,4439.29 C79.2@4325.2,4439.01 4325.2,4489.28 R147.1@4323.87,4490.61 4344.99,4511.73 U10.24@4489.8,4511.73
RST: H1.2 R7.1 | length 87.4
  Top Layer w6: R7.1@5505.62,4972.67 5568.44,4972.67 H1.2@5585.85,4955.26
RST(ADS8688): FPC1.10 U10.100 | length 1525.5
  Top Layer w6: FPC1.10@4795.49,3913.29 4795.49,3973.7 v1(4796.79,3975) ; U10.100@5340.2,4807.01 5397.99,4807.01 v1(5410,4795)
  Bottom Layer w6: v1(4796.79,3975) 5270,3975 5455,4160 5455,4750 v1(5410,4795)
SDIO_CLK: R33.1 U5.5 U10.113 | length 1379.3
  Top Layer w6: R33.1@4402.2,5851.57 4402.2,5878.42 v1(4402.75,5878.98) U5.5@4402.75,6018.98 ; v1(5145,5160) 5180.75,5124.25 U10.113@5180.75,5045.2
  Bottom Layer w6: v1(4402.75,5878.98) 4402.75,5807.25 5050,5160 v1(5145,5160)
SDIO_CMD: R30.1 U5.3 U10.116 | length 1262.9
  Top Layer w6: R30.1@4488.59,5852.04 4488.59,5878.2 v1(4489.37,5878.98) U5.3@4489.37,6018.98 ; v1(5120,5180.99) 5121.69,5179.3 U10.116@5121.69,5045.2
  Bottom Layer w6: v1(4489.37,5878.98) 4489.37,5811.62 v1(5120,5180.99)
SDIO_D0: R29.1 U5.7 U10.98 | length 1759.1
  Top Layer w6: U5.7@4316.14,6018.98 v1(4316.14,5878.98) 4316.8,5878.31 R29.1@4316.8,5851.85 ; v1(5284.02,4763.55) 5288.11,4767.64 U10.98@5340.2,4767.64
  Bottom Layer w6: v1(4316.14,5878.98) 5225.11,4970 5255,4970 5284.02,4940.98 v1(5284.02,4763.55)
SDIO_D1: R28.1 U5.8 U10.99 | length 1763.9
  Top Layer w6: R28.1@4272.62,5853.12 4272.62,6018.77 U5.8@4272.83,6018.98 ; v1(5259.92,4796.14) 5268.75,4787.32 U10.99@5340.2,4787.32
  Bottom Layer w6: v1(4272.47,5878.11) 5200.58,4950 5240,4950 5259.92,4930.08 v1(5259.92,4796.14)
SDIO_D2: R32.1 U5.1 U10.111 | length 1268
  Top Layer w6: R32.1@4574.52,5852.06 4574.63,5852.16 v1(4574.63,5878.28) 4574.63,6017.62 U5.1@4575.98,6018.98 ; v1(5166.21,5221.21) 5220.12,5167.31 U10.111@5220.12,5045.2
  Bottom Layer w6: v1(4574.63,5878.28) 4574.63,5812.8 v1(5166.21,5221.21)
SDIO_D3: R31.1 U5.2 U10.112 | length 1277.1
  Top Layer w6: R31.1@4532.15,5852.15 v1(4532.15,5878.45) 4532.68,5878.98 U5.2@4532.68,6018.98 ; v1(5145,5200) 5200.43,5144.57 U10.112@5200.43,5045.2
  Bottom Layer w6: v1(4532.15,5878.45) 4532.15,5812.85 v1(5145,5200)
SPI1_CS: FPC1.14 U10.40 | length 317.6
  Top Layer w6: U10.40@4629.57,4194.8 4629.57,4135.43 4716.75,4048.25 FPC1.14@4716.75,3913.29
SPI1_MISO: FPC1.12 U10.42 | length 317.6
  Top Layer w6: U10.42@4668.94,4194.8 4668.94,4136.06 4756.12,4048.88 FPC1.12@4756.12,3913.29
SPI1_MOSI: FPC1.11 U10.43 | length 317.6
  Top Layer w6: U10.43@4688.62,4194.8 4688.62,4131.38 4775.8,4044.2 FPC1.11@4775.8,3913.29
SPI1_SCK: FPC1.13 U10.41 | length 317.6
  Top Layer w6: U10.41@4649.25,4194.8 4649.25,4135.75 4736.43,4048.57 FPC1.13@4736.43,3913.29
SYS_JTCK-SWCLK: D10.1 R8.2 U10.109 | length 310.3
  Top Layer w6: U10.109@5259.49,5045.2 5259.49,5084.49 5312.78,5137.78 D10.1@5448.3,5137.78 5455.53,5130.56 R8.2@5505.48,5130.56
SYS_JTCK-SWDIO: D11.1 R9.2 U10.105 | length 310.8
  Top Layer w6: U10.105@5340.2,4905.43 5400.43,4905.43 5420,4925 5420,5048.6 D11.1@5448.63,5077.24 5453.02,5081.62 R9.2@5505.63,5081.62
UB: U2.40 U10.141 | length 328.2
  Top Layer w6: U10.141@4629.57,5045.2 4629.57,4988.24 v1(4635.14,4982.67)
  Bottom Layer w6: v1(4635.14,4982.67) 4636.4,4981.41 4636.4,4967.51 4632.16,4963.26 4624.64,4963.26 4620.4,4959.02 4620.4,4947.82 4624.64,4943.58 4648.17,4943.58 4652.41,4939.34 4652.41,4928.14 4648.17,4923.89 4640.65,4923.89 4636.4,4919.65 4636.4,4833.6 4645.28,4824.72 U2.40@4697.34,4824.72
USART1_RX: H7.3 U10.102 | length 582.1
  Top Layer w6: U10.102@5340.2,4846.38 5388.62,4846.38 5394.92,4840.08 5469.92,4840.08 5515,4795 5515,4540.91 5555,4500.91 5584.61,4500.91 5588.85,4505.15 H7.3@5588.85,4544.91
USART1_TX: H7.4 U10.101 | length 578.9
  Top Layer w6: U10.101@5340.2,4826.69 5466.34,4826.69 5503,4790.03 5503,4535.94 5550.03,4488.91 5584.61,4488.91 5588.85,4484.67 H7.4@5588.85,4444.91
USART2_RX: H8.3 U10.37 | length 740
  Top Layer w6: H8.3@3937.62,4081.93 3981.62,4125.93 3992.59,4125.93 4044.65,4178 4494.97,4178 4556.97,4240 4564.49,4240 4570.51,4233.98 U10.37@4570.51,4194.8
USART2_TX: H8.4 U10.36 | length 739.5
  Top Layer w6: H8.4@3937.62,4181.93 3981.62,4137.93 3987.62,4137.93 4039.68,4190 4485,4190 4540,4245 4540,4265 4529.49,4275.51 U10.36@4489.8,4275.51
USB_OTG_FS_DM: R22.1 U10.103 | length 1568.5
  Top Layer w6: R22.1@5236.98,6029.96 5213.33,6053.6 5207.18,6053.6 5197,6043.42 5197,5869.97 5243.49,5823.49 5326.21,5823.49 v1(5328.95,5820.75) ; U10.103@5340.2,4866.06 5410.74,4866.06 v1(5415.72,4861.08)
  Bottom Layer w6: v1(5328.95,5820.75) 5336.68,5813.02 5336.68,5730.29 5509.01,5557.96 5509.01,4889.01 5490.13,4870.13 5442.78,4870.13 5433.73,4861.08 v1(5415.72,4861.08)
USB_OTG_FS_DP: R21.1 U10.104 | length 1568.4
  Top Layer w6: R21.1@5236.83,6089.25 5213.18,6065.6 5202.21,6065.6 5185,6048.39 5185,5865 5245,5805 5302.27,5805 v1(5311.97,5795.31) ; U10.104@5340.2,4885.75 5410.42,4885.75 v1(5415.84,4891.18)
  Bottom Layer w6: v1(5311.97,5795.31) 5315.47,5791.81 5315.47,5734.53 5324.14,5725.86 5324.14,5719.86 5321.41,5717.12 5321.41,5711.12 5323.89,5708.64 5329.89,5708.64 5332.63,5711.37 5338.63,5711.37 5497.01,5552.99 5497.01,4893.98 5485.16,4882.13 5442.9,4882.13 5433.85,4891.18 v1(5415.84,4891.18)
WE: U2.17 U10.119 | length 671.5
  Top Layer w6: v1(5060,4740) 5062.64,4742.64 U10.119@5062.64,5045.2
  Bottom Layer w6: v1(5060,4740) 5060,4491.62 5065.25,4486.37 5065.25,4459.75 5078.23,4446.77 U2.17@5142.66,4446.77
WKUP: R2.1 U10.34 | length 515.1
  Top Layer w6: R2.1@4092.87,4455.47 4093.02,4455.32 v1(4093.02,4433.76) ; v1(4425,4305) 4434.88,4314.88 U10.34@4489.8,4314.88
  Bottom Layer w6: v1(4093.02,4433.76) 4093.02,4366.98 4155,4305 v1(4425,4305)